# Altium PCB DIOT_Sampler_Adapter.PCBDOC (part 3 of 3)
Units mm, origin at the board's own origin, x right, y up, seen from the top; angles counter-clockwise.
Board outline 37 x 98.9 mm, 4 copper layers (L1, P2, L3, L4), stack 1.6 mm thick; 18 components, 14 nets, 57 pads, 0 vias.
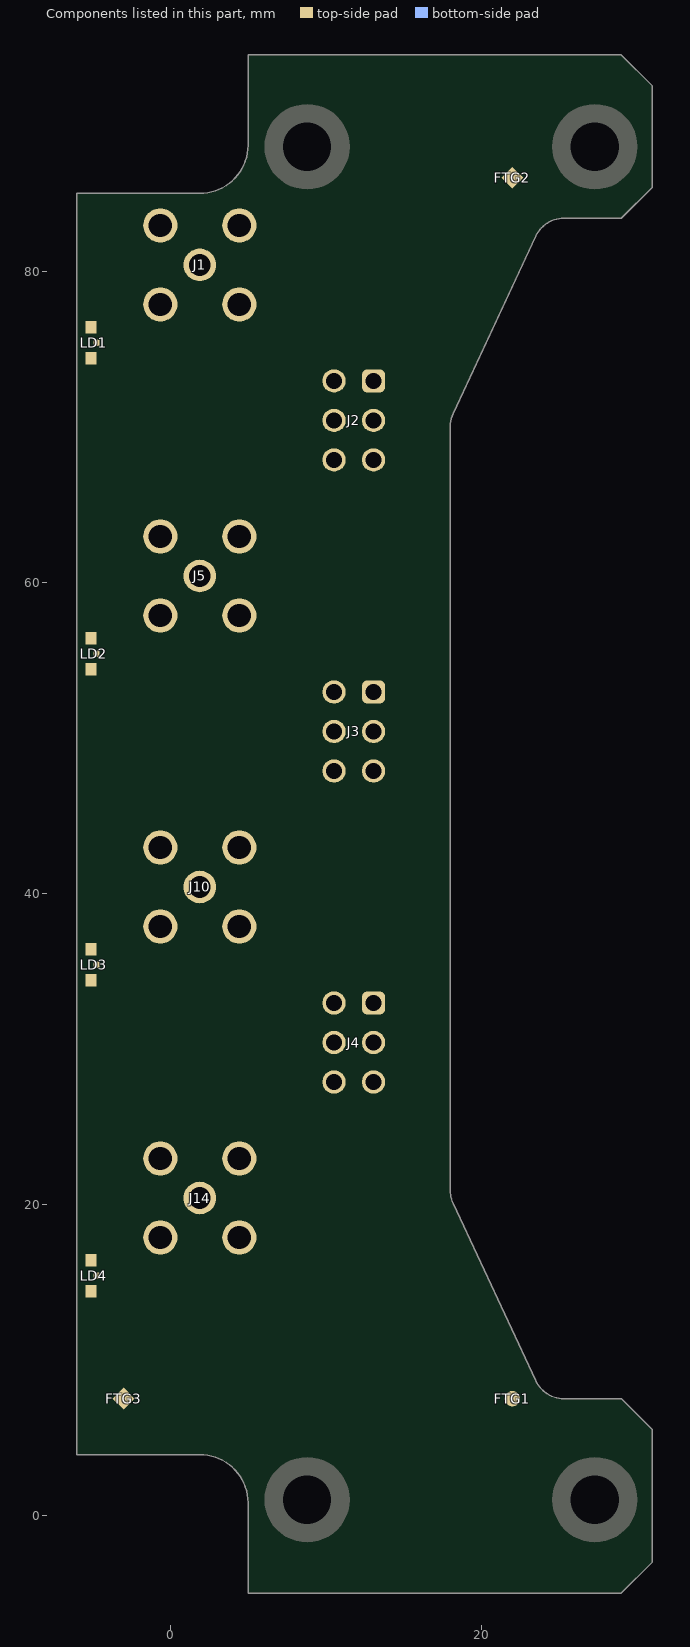
[diagram p4: the components of this part, seen from the top]

## Silkscreen, mask and mechanical layers (free items; w line width, h text height) (continued)
Mechanical8:
  drawing of 295 lines, arcs and shapes, not listed
  text "Layer" at -27.292,144.961 h1.52
  text "Name" at -16.88,144.961 h1.52
  text "Material" at 5.212,144.961 h1.52
  text "Thickness" at 27.05,144.961 h1.52
  text "Constant" at 43.556,144.961 h1.52
  text "Board Layer Stack" at 58.03,144.961 h1.52
  text "TopOverlay" at -16.88,141.913 h1.52
  text "TopSolder" at -16.88,138.865 h1.52
  text "Solder Resist" at 5.212,138.865 h1.52
  text "0.010mm" at 27.05,138.865 h1.52
  text "3.5" at 43.556,138.865 h1.52
  text "1" at -27.292,135.817 h1.52
  text "L1" at -16.88,135.817 h1.52
  text "0.045mm" at 27.05,135.817 h1.52
  text "Dielectric1" at -16.88,132.769 h1.52
  text "FR-4" at 5.212,132.769 h1.52
  text "0.120mm" at 27.05,132.769 h1.52
  text "4.2" at 43.556,132.769 h1.52
  text "2" at -27.292,129.721 h1.52
  text "P2" at -16.88,129.721 h1.52
  text "0.035mm" at 27.05,129.721 h1.52
  text "Dielectric 3" at -16.88,126.673 h1.52
  text "1.200mm" at 27.05,126.673 h1.52
  text "4.2" at 43.556,126.673 h1.52
  text "3" at -27.292,123.625 h1.52
  text "L3" at -16.88,123.625 h1.52
  text "0.035mm" at 27.05,123.625 h1.52
  text "Dielectric2" at -16.88,120.577 h1.52
  text "FR-4" at 5.212,120.577 h1.52
  text "0.120mm" at 27.05,120.577 h1.52
  text "4.2" at 43.556,120.577 h1.52
  text "4" at -27.292,117.529 h1.52
  text "L4" at -16.88,117.529 h1.52
  text "0.045mm" at 27.05,117.529 h1.52
  text "BottomSolder" at -16.88,114.481 h1.52
  text "Solder Resist" at 5.212,114.481 h1.52
  text "0.010mm" at 27.05,114.481 h1.52
  text "3.5" at 43.556,114.481 h1.52
  text "BottomOverlay" at -16.88,111.433 h1.52
Mechanical13:
  lines w0.01: -6.352,-6.334 -6.352,75.374